# Altium PCB RF_FILTER_PCB1.PcbDoc
Units mm, origin at the board's own origin, x right, y up, seen from the top; angles counter-clockwise.
Board outline 92 x 35 mm, 2 copper layers (Top Layer, Bottom Layer), stack 1.601 mm thick; 37 components, 20 nets, 93 pads, 117 vias.
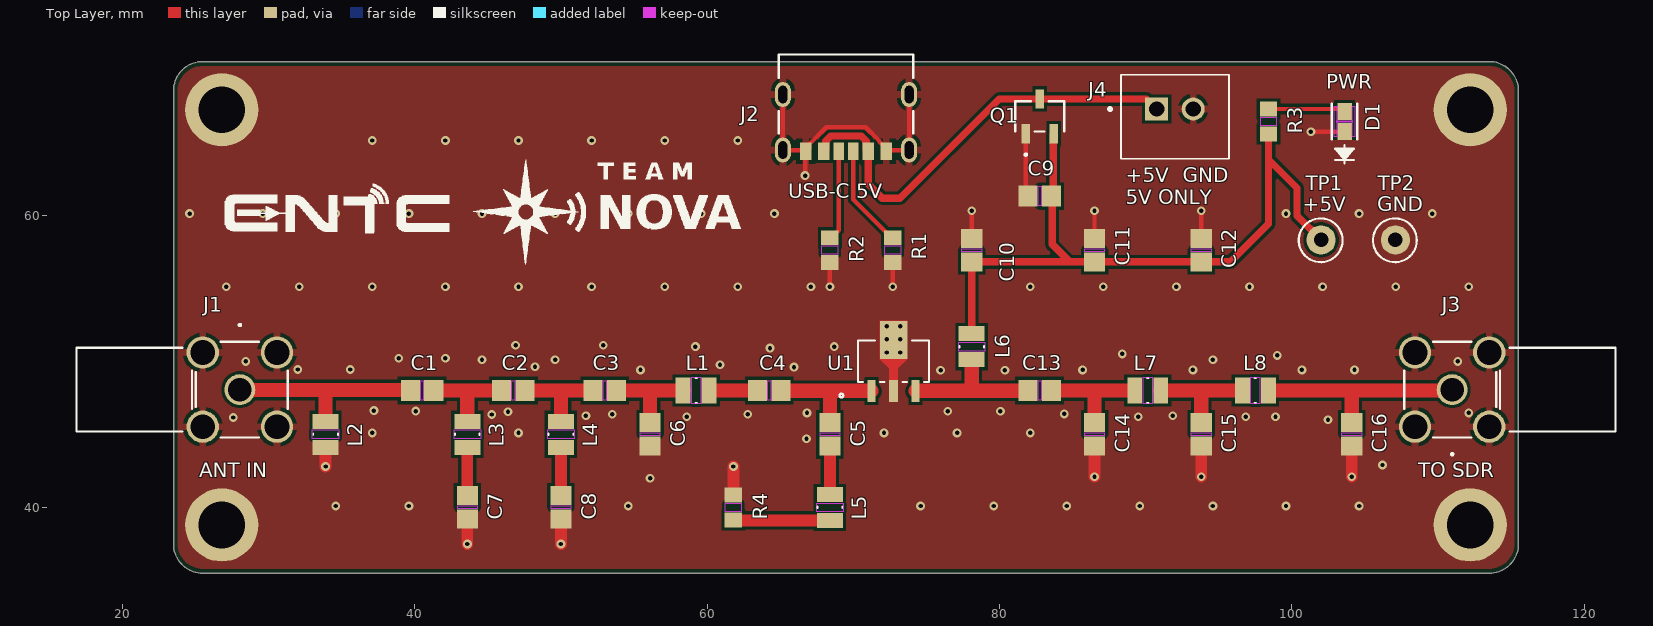
[diagram p0: Top Layer view]
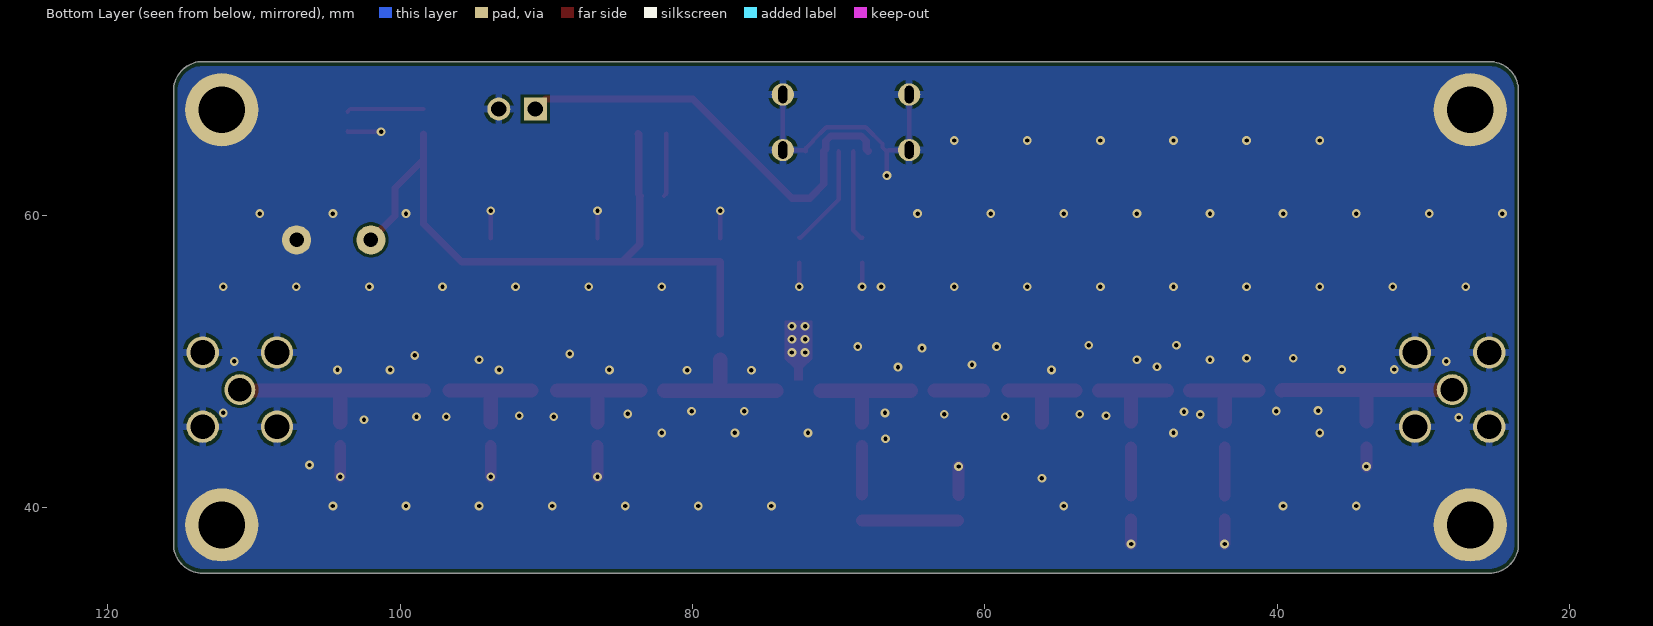
[diagram p1: Bottom Layer view, seen from below]
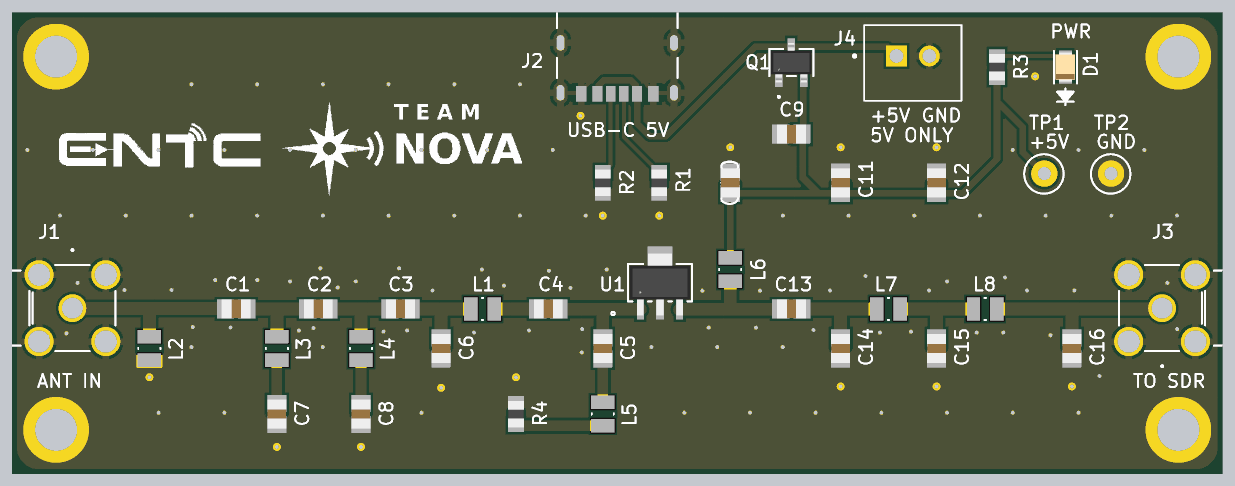
[diagram p2: 3D render of the assembled board from above, using the file's embedded part models]

## Layer stack, top to bottom
Top Solder: solder mask 0.0102, Solder Resist, Dk 3.5
Top Layer: signal copper 0.0356
Dielectric 1: dielectric 1.53, FR-4, Dk 4.5
Bottom Layer: signal copper 0.0356
Bottom Solder: solder mask 0.0102, Solder Resist, Dk 3.5

## Board outline
23.5,37.5 23.5,68.5 cw(c25.5,68.5) 25.5,70.5 113.5,70.5 cw(c113.5,68.5) 115.5,68.5 115.5,37.5 cw(c113.5,37.5) 113.5,35.5 25.5,35.5 cw(c25.5,37.5)

## Design rules (kind name [scope] priority, off if disabled: settings)
BoardOutlineClearance Edge_Clearance [All] p1: gap=0.3 ignorepadtopadclearanceinfootprint=FALSE
Clearance RF_to_GND [InNetClass('RF_50R') vs InNet('GND')] p1: gap=0.2 ignorepadtopadclearanceinfootprint=FALSE
Clearance [All] p2: gap=0.2 ignorepadtopadclearanceinfootprint=FALSE
HoleSize [All] p1: absolutevalues=TRUE maxlimit=3.5 minlimit=0.025 maxpercent=80.000 minpercent=20.000
HoleToHoleClearance [All] p1: gap=0.5 allowstackedmicrovias=TRUE
PolygonConnect TH_Relief [InComponent('J1') or InComponent('J2') or InComponent('J3') or InComponent('J4')] p1: connectstyle=Relief reliefconductorwidth=0.5 reliefentries=4 polygonreliefangle="90 Angle" airgapwidth=0.25
PolygonConnect [All] p2: connectstyle=Direct reliefconductorwidth=0.254 reliefentries=4 polygonreliefangle="90 Angle" airgapwidth=0.254
RoutingVias [All] p1: holewidth=0.3 width=0.6 viastyle="Through Hole" minholewidth=0.3 minwidth=0.6 maxholewidth=0.3 maxwidth=0.6
SolderMaskExpansion [All] p1: expansion=0 istentingtop=FALSE
SupplyNets "Schematic Supply Nets_1" [InNet('+5V')] p1: voltage=0.000
SupplyNets "Schematic Supply Nets" [InNet('GND')] p2: voltage=0.000
Width RF_50R_Width [InNetClass('RF_50R')] p1: maxlimit=0.976 minlimit=0.254 preferedwidth=0.976 toplayer_minwidth=0.976 impedanceprofiledriven=TRUE impedanceprofileid={FF6C7153-5CF2-474A-BE3D-1033C8F94AAB} impedanceprofilevalue=50.000000 minimp=50.000000 maximp=50.000000 favimp=50.000000
Width Power_Width [InNet('+5V') or InNet('NetJ2_A9')] p2: maxlimit=1 minlimit=0.4 preferedwidth=0.5
Width [All] p3: maxlimit=1 minlimit=0.2 preferedwidth=0.3
28 further rules are at their usual default settings.

## Classes and differential pairs
net class RF_50R: RF_ANT RF_HPF1 RF_HPF2 RF_HPF3 RF_IN RF_LNA_OUT RF_LPF1 RF_LPF2 RF_MATCH RF_OUT

## Components (designator, comment, footprint, x,y, rotation, side; value= is the part's Value field where it differs from the comment)
C1 "22pF" CAPC220145_88N_KEM 40.5,48 r0 top
C2 "22pF" CAPC220145_88N_KEM 46.75,48 r0 top
C3 "100pF" CAPC220145_88N_KEM 53,48 r0 top
C4 "1nF" CAPC220145_88N_KEM 64.25,48 r0 top
C5 "330pF" CAPC220145_88N_KEM 68.4,45 r90 top
C6 "100nF" CAPC220145_88N_KEM 56.1,45 r90 top
C7 "27pF" CAPC220145_88N_KEM 43.6,40 r90 top
C8 "47pF" CAPC220145_88N_KEM 50,40 r90 top
C9 "10uF" CAPC220145_88N_KEM 82.75,61.3 r0 top
C10 "100pF" CAPC220145_88N_KEM 78.1,57.6 r270 top
C11 "100nF" CAPC220145_88N_KEM 86.5,57.6 r270 top
C12 "10uF" CAPC220145_88N_KEM 93.8,57.6 r270 top
C13 "1nF" CAPC220145_88N_KEM 82.75,48 r0 top
C14 "10pF" CAPC220145_88N_KEM 86.5,45 r90 top
C15 "18pF" CAPC220145_88N_KEM 93.8,45 r90 top
C16 "10pF" CAPC220145_88N_KEM 104.1,45 r90 top
D1 "VLMR233T2V2-GS08" LED_VISHAY_VLMX233_VIS 103.6,66.4 r90 top value="Red LED"
J1 "5-1814400-2" COAX4GND_5-1814400-2_TEC 28.04,48.06 r90 top value=SMA
J2 "2171750001" 2171750001_MOL 69.5,67.4 r180 top value=USB-C
J3 "5-1814400-2" COAX4GND_5-1814400-2_TEC 110.96,48.06 r270 top value=SMA
J4 "B2B-XH-A(LF)(SN)" JST_B2B-XH-A 92,66.725 r180 top value="JST-XH 2P"
L1 "18nH" IND_AISC-0805-R082J-T 59.25,48 r0 top
L2 "82nH" IND_AISC-0805-R082J-T 33.9,45 r90 top
L3 "82nH" IND_AISC-0805-R082J-T 43.6,45 r90 top
L4 "68nH" IND_AISC-0805-R082J-T 50,45 r90 top
L5 "620nH" IND_AISC-0805-R082J-T 68.4,40 r90 top
L6 "390nH" IND_AISC-0805-R082J-T 78.1,51 r90 top
L7 "33nH" IND_AISC-0805-R082J-T 90.14,48 r0 top
L8 "33nH" IND_AISC-0805-R082J-T 97.5,48 r0 top
Q1 "AO3401A" SOT-23-3L_AOS 82.75,66.75 r0 top
R1 "5.1kΩ" RC0805N_YAG 72.7,57.6 r270 top
R2 "5.1kΩ" RC0805N_YAG 68.4,57.6 r270 top
R3 "1kΩ" RC0805N_YAG 98.4,66.4 r90 top
R4 "150Ω" RC0805N_YAG 61.8,40 r90 top
TP1 "TestPoint" TP_PTH_1.0 102,58.3 r0 top value=N/A
TP2 "TestPoint" TP_PTH_1.0 107.08,58.3 r0 top value=N/A
U1 "PGA-103+" DF782_MNC-M 72.75,50 r0 top

## Footprints (in the part's own frame and the unit in brackets; to place one, negate y for a bottom-side part, rotate by r counter-clockwise, add the part's x,y. Pads: shape width x height; smd on the part's side, far side on the other; paste and mask are expansions set on the pad)
2171750001_MOL [mil]
  oval 43x67 / inner oval 43x67 / far side round 60 hole 47 slot 24 at 0 deg paste-99999 mask-33.5: 7(-170.08,116.31) 8(170.08,116.31) 9(-170.08,-33.29) 10(170.08,-33.29)
  rect 28x47 smd paste+0 mask+0: A5(-19.68,119.46) B5(19.68,119.46)
  rect 30x47 smd paste+0 mask+0: A9(59.84,119.46) B9(-59.84,119.46)
  rect 32x47 smd paste+0 mask+0: A12(108.27,119.46) B12(-108.27,119.46)
  silkscreen extent -181,-141 181,71
CAPC220145_88N_KEM [mm]
  rect 1.306x1.45 smd paste+0 mask+0: 1(-0.803,0) 2(0.803,0)
  Top Layer keep-out region: -0.099,-0.674 -0.099,0.674 0.099,0.674 0.099,-0.674
  body extent -1.1,-0.72 1.1,0.72, height 0.88
COAX4GND_5-1814400-2_TEC [mil]
  round 83 / inner round 60 / far side round 83 hole 63 paste-99999 mask+0: 1(0,0)
  round 87 / inner round 60 / far side round 87 hole 67 paste-99999 mask+0: 2(-100,100) 3(-100,-100) 4(100,-100) 5(100,100)
  silkscreen extent -129,-129 177,440
DF782_MNC-M [mm]
  rect 0.533x1.494 smd paste+0 mask+0: 1(-1.499,-2.042) 3(1.499,-2.042)
  rect 0.609x1.494 smd paste+0 mask+0: 2(0,-2.042)
  rect 1.88x2.61 smd paste+0 mask+0: 2(0,1.457)
  Top Layer region: 0.304,-1.295 -0.304,-1.295 -0.304,-0.482 -0.939,0.153 -0.939,2.76 0.939,2.76 0.939,0.153 0.304,-0.482
  silkscreen extent -3.7,-2.48 2.43,1.42, body extent -2.3,-2.49 2.3,2.21, height 1.65
IND_AISC-0805-R082J-T [mm]
  rect 1.02x1.78 smd paste+0 mask+0.102: 1(-0.89,0) 2(0.89,0)
  Top Layer keep-out region: -0.3,0.9 0.3,0.9 0.3,-0.9 -0.3,-0.9
  silkscreen extent -0.06,-0.84 0.06,0.84
JST_B2B-XH-A [mm]
  rect 1.575x1.575 / inner round 1.575 / far side rect 1.575x1.575 hole 1.05: 1(1.25,-0.525)
  round 1.575 hole 1.05: 2(-1.25,-0.525)
  silkscreen extent -3.7,-2.88 4.54,2.88
LED_VISHAY_VLMX233_VIS [mil]
  rect 46x39 smd paste+0 mask+0: 1(-26.5,0) 2(26.5,0)
  Top Layer keep-out region: -1.5,-21.5 -1.5,21.5 1.5,21.5 1.5,-21.5
  Top Layer keep-out region: -41.5,21.5 -41.5,27.5 41.5,27.5 41.5,21.5
  Top Layer keep-out region: -41.5,-27.5 -41.5,-21.5 41.5,-21.5 41.5,-27.5
  silkscreen extent -114,-34 48,34, body extent -44,-29 44,29, height 57
RC0805N_YAG [mil]
  rect 40x47 smd paste+0 mask+0: 1(-33.5,0) 2(33.5,0)
  Top Layer keep-out region: -11.5,-21.5 -11.5,21.5 11.5,21.5 11.5,-21.5
  body extent -39,-24 39,24, height 28
SOT-23-3L_AOS [mil]
  rect 22.36x51.56 smd paste+0 mask+0: 1(-37.5,-47) 2(37.5,-47) 3(0,47)
  silkscreen extent -66,-106 66,40, body extent -61,-59 61,59, height 49
TP_PTH_1.0 [mm]
  round 2 hole 1: 1(0,0)
  silkscreen extent -1.53,-1.52 1.47,1.47

## Part data
C1 C2: library part 0805CG220J500NT, "CAP CER 22pF 50V C0G 0805", LCSC Part #=C24658, Manufacturer="FH (Guangdong Fenghua Advanced Tech)", Manufacturer Part Number=0805CG220J500NT
C3 C10: library part 0805CG101J500NT, "CAP CER 100pF 50V C0G 0805", LCSC Part #=C82028, Manufacturer="FH (Guangdong Fenghua Advanced Tech)", Manufacturer Part Number=0805CG101J500NT
C4 C13: library part 0805CG102J500NT, "CAP CER 1nF 50V C0G 0805", LCSC Part #=C29925, Manufacturer="FH (Guangdong Fenghua Advanced Tech)", Manufacturer Part Number=0805CG102J500NT
C5: library part 0805CG331J500NT, "CAP CER 330pF 50V C0G 0805", LCSC Part #=C1815, Manufacturer="FH (Guangdong Fenghua Advanced Tech)", Manufacturer Part Number=0805CG331J500NT
C6 C11: library part 0805B104J500NT, "CAP CER 100nF 50V X7R 0805", LCSC Part #=C29926, Manufacturer="FH (Guangdong Fenghua Advanced Tech)", Manufacturer Part Number=0805B104J500NT
C7: library part 0805CG270J500NT, "CAP CER 27pF 50V C0G 0805", LCSC Part #=C1808, Manufacturer="FH (Guangdong Fenghua Advanced Tech)", Manufacturer Part Number=0805CG270J500NT
C8: library part 0805CG470J500NT, "CAP CER 47pF 50V C0G 0805", LCSC Part #=C24659, Manufacturer="FH (Guangdong Fenghua Advanced Tech)", Manufacturer Part Number=0805CG470J500NT
C9 C12: library part 0805X106K500NT, "CAP CER 10uF 50V X5R 0805", LCSC Part #=C6117579, Manufacturer="FH (Guangdong Fenghua Advanced Tech)", Manufacturer Part Number=0805X106K500NT
C14 C16: library part 0805CG100J500NT, "CAP CER 10pF 50V C0G 0805", LCSC Part #=C157608, Manufacturer="FH (Guangdong Fenghua Advanced Tech)", Manufacturer Part Number=0805CG100J500NT
C15: library part 0805CG180J500NT, "CAP CER 18pF 50V C0G 0805", LCSC Part #=C1797, Manufacturer="FH (Guangdong Fenghua Advanced Tech)", Manufacturer Part Number=0805CG180J500NT
D1: "LED RED 0805 SMD", LCSC Part #=C511093, Manufacturer=Vishay, Manufacturer Part Number=VLMR233T2V2-GS08
J1 J3: "CONN RCPT SMA TH", LCSC Part #=C3174972, Manufacturer="TE Connectivity", Manufacturer Part Number=5-1814400-2
J2: "TYPE C 6 PIN TOP MOUNT SMT", LCSC Part #=C3197922, Manufacturer=Molex, Manufacturer Part Number=2171750001
J4: "CONN HEADER TH 2POS 2.5mm", LCSC Part #=C158012, Manufacturer=JST, Manufacturer Part Number=B2B-XH-A(LF)(SN)
L1: library part AHW2012C-18NJTF, "FIXED IND 18nH 600mA 0.2Ω 0805", LCSC Part #=C6808029, Manufacturer=APV, Manufacturer Part Number=AHW2012C-18NJTF
L2 L3: library part AHW2012C-82NJTF, "FIXED IND 82nH 400mA 0.42Ω 0805", LCSC Part #=C6364713, Manufacturer=APV, Manufacturer Part Number=AHW2012C-82NJTF
L4: library part AHW2012C-68NJTF, "FIXED IND 68nH 500mA 0.38Ω 0805", LCSC Part #=C6808042, Manufacturer=APV, Manufacturer Part Number=AHW2012C-68NJTF
L5: library part AHW2012C-R62JTF, "FIXED IND 620nH 210mA 2.2Ω 0805", LCSC Part #=C19633939, Manufacturer=APV, Manufacturer Part Number=AHW2012C-R62JTF
L6: library part AHW2012C-R39JTF, "FIXED IND 0.39uH 290mA 1.5Ω 0805", LCSC Part #=C6808052, Manufacturer=APV, Manufacturer Part Number=AHW2012C-R39JTF
L7 L8: library part AHW2012C-33NJTF, "FIXED IND 33nH 500mA 0.27Ω 0805", LCSC Part #=C6808037, Manufacturer=APV, Manufacturer Part Number=AHW2012C-33NJTF
Q1: "MOSFET P-CH 30V 4A SOT-23", LCSC Part #=C15127, Manufacturer="Alpha & Omega Semiconductor", Manufacturer Part Number=AO3401A
R1 R2: library part RS-05K5101FT, "RES 5.1kΩ ±1% 125mW 0805", LCSC Part #=C118848, Manufacturer="FH (Guangdong Fenghua Advanced Tech)", Manufacturer Part Number=RS-05K5101FT
R3: library part RS-05K102JT, "RES 1kΩ ±5% 125mW 0805", LCSC Part #=C115302, Manufacturer="FH (Guangdong Fenghua Advanced Tech)", Manufacturer Part Number=RS-05K102JT
R4: library part RS-05K1500FT, "RES 150Ω ±1% 125mW 0805", LCSC Part #=C304819, Manufacturer="FH (Guangdong Fenghua Advanced Tech)", Manufacturer Part Number=RS-05K1500FT
TP1 TP2: "Test point, 1.0 mm plated hole", LCSC Part #=N/A, Manufacturer=N/A, Manufacturer Part Number=N/A
U1: "RF Amplifier IC CATV, Cellular, DBS, MMDS, PCS, WLAN, Wireless LAN 50MHz ~ 4GHz SOT-89", LCSC Part #=C3008207, Manufacturer=Mini-Circuits, Manufacturer Part Number=PGA-103+

## Free pads (board coordinates)
  round 5 hole 3.2: H1(26.8,38.8) H2(112.2,38.8) H3(26.8,67.2) H4(112.2,67.2)

## Via types
v1: diameter 0.6, hole 0.3, Top Layer to Bottom Layer, tented both sides, 96 vias
v2: diameter 0.6, hole 0.3, Top Layer to Bottom Layer, 21 vias

## Nets (pads, with @x,y where several pads share a name; then routed paths per layer and width w, separated by ;. In a path a pad name is that pad's centre, name@x,y a point inside that pad or via, vN(x,y) a via of type N, cw(c..) or ccw(c..) an arc to the next point about the centre after c; other vN are vias at no path point)
+5V: C9.2 C10.2 C11.2 C12.2 L6.2 Q1.2 R3.1 TP1.1 | length 48.8
  Top Layer w0.5: L6.2 C10.2 84.803,56.797 ; Q1.2 83.668,65.522 83.668,61.416 C9.2 83.6,61.253 83.6,58 84.803,56.797 ; R3.1 98.4,63.798 ; TP1.1 100.35,59.95 100.35,61.848 98.4,63.798 ; 84.803,56.797 C11.2 C12.2 95.797,56.797 98.4,59.4 98.4,63.798
GND: C6.1 C7.1 C8.1 C9.1 C10.1 C11.1 C12.1 C14.1 C15.1 C16.1 D1.1 J1.2 J1.3 J1.4 J1.5 J2.7 J2.8 J2.9 J2.10 J2.A12 J2.B12 J3.2 J3.3 J3.4 J3.5 J4.2 L2.1 pad.H1 pad.H2 pad.H3 pad.H4 Q1.1 R1.2 R2.2 R4.2 TP2.1 U1.2 | length 48.2
  Top Layer w0.3: J2.10 J2.8 66.62,64.446 J2.A12@66.725,64.341 ; v2(66.7,62.7) 66.725,62.725 J2.A12@66.725,64.341 ; v2(68.4,55.1) R2.2 ; v2(72.7,55.1) R1.2 ; J2.9 J2.7 72.33,64.446 J2.B12 72.25,64.556 71.758,65.048 71.758,65.1 70.846,66.012 68.154,66.012 67.006,64.865 67.006,64.622 J2.A12@66.725,64.341 ; C10.1 v2(78.1,60.3) ; Q1.1 81.797,61.45 C9.1 ; C11.1 v2(86.5,60.3) ; C12.1 v2(93.8,60.3) ; v2(101.3,65.7) 103.573,65.7 D1.1
  Top Layer w0.8: v2(33.9,42.8) L2.1 ; v2(43.6,37.5) C7.1 ; v2(50,37.5) C8.1 ; R4.2 v2(61.8,42.8) ; v2(86.5,42.1) C14.1 ; v2(93.8,42.1) C15.1 ; v2(104.1,42.1) C16.1
  other v1: 34.6,40.1 39.6,40.1 54.6,40.1 74.6,40.1 79.6,40.1 84.6,40.1 89.6,40.1 94.6,40.1 99.6,40.1 104.6,40.1 106.2,42.9 66.8,44.7 37.1,45.1 47.1,45.1 72.1,45.1 77.1,45.1 82.1,45.1 102.473,45.998 27.591,46.148 58.601,46.202 89.491,46.202 96.851,46.202 98.879,46.202 51.709,46.275 91.856,46.267 45.273,46.359 53.509,46.367 62.778,46.369 84.431,46.397 66.829,46.465 112.106,46.466 46.376,46.543 40.066,46.589 76.462,46.574 80.062,46.574 37.208,46.625 75.97,49.384 80.371,49.384 55.441,49.405 85.687,49.405 93.228,49.405 100.685,49.405 104.285,49.405 31.991,49.435 35.591,49.435 65.941,49.602 48.228,49.63 60.885,49.767 28.434,49.987 111.354,49.987 44.6,50.1 49.6,50.1 94.6,50.1 38.9,50.2 42.1,50.2 99,50.4 88.4,50.5 64.3,50.9 59.2,51 68.7,51 46.9,51.1 52.9,51.1 27.1,55.1 32.1,55.1 37.1,55.1 42.1,55.1 47.1,55.1 52.1,55.1 57.1,55.1 62.1,55.1 67.1,55.1 82.1,55.1 87.1,55.1 92.1,55.1 97.1,55.1 102.1,55.1 107.1,55.1 112.1,55.1 24.6,60.1 29.6,60.1 34.6,60.1 39.6,60.1 44.6,60.1 49.6,60.1 54.6,60.1 59.6,60.1 64.6,60.1 99.6,60.1 104.6,60.1 109.6,60.1 37.1,65.1 42.1,65.1 47.1,65.1 52.1,65.1 57.1,65.1 62.1,65.1
  other v2: 56.1,42 72.3,50.6 73.2,50.6 72.3,51.5 73.2,51.5 72.3,52.4 73.2,52.4
NetC5_1: C5.1 L5.2 | length 3.3
  Top Layer w0.8: L5.2 C5.1
NetC7_2: C7.2 L3.1 | length 3.3
  Top Layer w0.8: C7.2 L3.1
NetC8_2: C8.2 L4.1 | length 3.3
  Top Layer w0.8: C8.2 L4.1
NetD1_2: D1.2 R3.2 | length 5.3
  Top Layer w0.3: R3.2 103.422,67.251 D1.2
NetJ2_A5: J2.A5 R1.1 | length 7.1
  Top Layer w0.3: J2.A5 70,61.062 72.611,58.451 R1.1
NetJ2_A9: J2.A9 J2.B9 J4.1 Q1.3 | length 30.1
  Top Layer w0.5: J2.A9 68.111,64.497 68.111,65.065 68.458,65.412 70.542,65.412 70.889,65.066 70.889,64.497 J2.B9 71.02,62.119 71.989,61.15 73.189,61.15 79.983,67.944 Q1.3 90.056,67.944 J4.1
NetJ2_B5: J2.B5 R2.1 | length 6.2
  Top Layer w0.3: R2.1 68.489,58.451 69,58.962 J2.B5
NetL5_1: L5.1 R4.1 | length 6.6
  Top Layer w0.3: R4.1 R4.1@61.839,39.11
  Top Layer w0.8: R4.1@61.839,39.11 L5.1
RF_ANT: C1.1 J1.1 L2.2 | length 13.8
  Top Layer w0.976: J1.1 28.07,48.03 33.869,48.03 ; L2.2 33.9,47.999 33.869,48.03 ; C1.1 39.667,48.03 33.869,48.03
RF_HPF1: C1.2 C2.1 L3.2 | length 6.8
  Top Layer w0.976: C1.2 43.625,48 ; L3.2 43.6,47.975 43.625,48 ; C2.1 43.625,48
RF_HPF2: C2.2 C3.1 L4.2 | length 6.8
  Top Layer w0.976: C2.2 49.875,48 ; L4.2 50,47.875 49.875,48 ; C3.1 49.875,48
RF_HPF3: C3.2 C6.2 L1.1 | length 6.8
  Top Layer w0.976: C3.2 56.081,48 ; C6.2 56.1,47.981 56.081,48 ; L1.1 56.081,48
RF_IN: C4.2 C5.2 U1.1 | length 8.5
  Top Layer w0.976: C4.2 65.074,47.979 68.152,47.979 ; C5.2 68.4,47.731 68.152,47.979 ; U1.1 71.23,47.979 68.152,47.979
RF_LNA_OUT: C13.1 L6.1 U1.3 | length 9.8
  Top Layer w0.976: U1.3 74.27,47.979 78.098,47.979 ; L6.1 78.1,47.981 78.098,47.979 ; C13.1 81.926,47.979 78.098,47.979
RF_LPF1: C13.2 C14.2 L7.1 | length 7.9
  Top Layer w0.976: C13.2 86.401,48 ; C14.2 86.5,47.901 86.401,48 ; L7.1 86.401,48
RF_LPF2: C15.2 L7.2 L8.1 | length 7.8
  Top Layer w0.976: L7.2 93.82,48 ; C15.2 93.8,47.98 93.82,48 ; L8.1 93.82,48
RF_MATCH: C4.1 L1.2 | length 3.3
  Top Layer w0.976: L1.2 C4.1
RF_OUT: C16.2 J3.1 L8.2 | length 14.8
  Top Layer w0.976: L8.2 104.05,48 ; C16.2 104.1,47.95 104.05,48 ; J3.1 110.9,48 104.05,48

## Polygon pours and split planes (outlines as drawn)
GND on Top Layer "GND_Top" (solid, remove dead copper, pour order 2): 23.5,70.5 23.6,70.6 115.3,70.6 115.3,35.7 115.5,35.5 23.5,35.5
GND on Bottom Layer "GND_Bottom" (solid, remove dead copper, pour order 0): 23.5,70.5 115.4,70.5 115.4,35.7 115.6,35.5 23.5,35.5

## Silkscreen, mask and mechanical layers (free items; w line width, h text height)
Top Overlay:
  drawing of 20 lines, arcs and shapes, not listed
  text "PWR" at 102.35,68.65 h1
  text "+5V" at 88.65,62.25 h1
  text "GND" at 92.55,62.25 h1
  text "USB-C 5V" at 65.55,61.15 h1
  text "5V ONLY" at 88.65,60.75 h1
  text "+5V" at 100.75,60.25 h1
  text "GND" at 105.85,60.25 h1
  text "ANT IN" at 25.25,42.05 h1
  text "TO SDR" at 108.65,42.05 h1
Board Outline:
  the board outline again, w0.1

## Text inside footprints (layer, text, board x,y; h text height)
J2: Mechanical 13 "*" at 70.326,65.749 h1.27 r180